# Altium PCB PMI_Action.PcbDoc
Units mm, origin at the board's own origin, x right, y up, seen from the top; angles counter-clockwise.
Board outline 87 x 58 mm, 2 copper layers (Top Layer, Bottom Layer); 69 components, 45 nets, 215 pads, 30 vias.
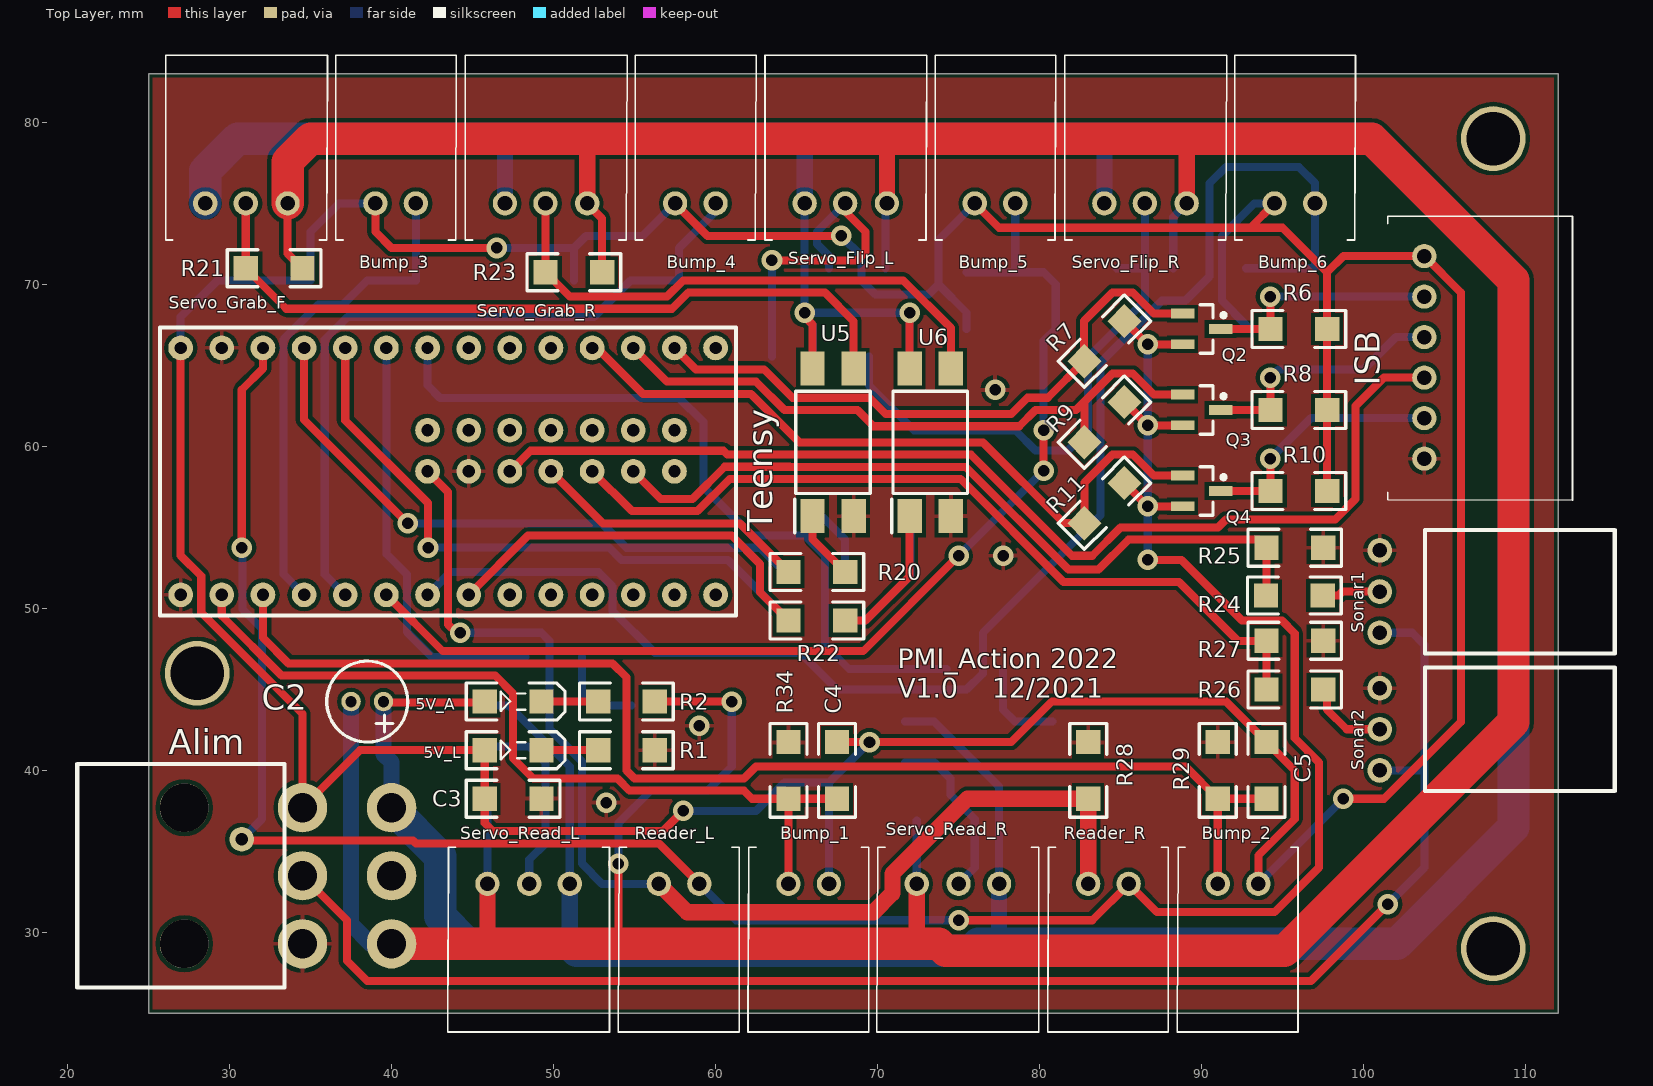
[diagram p0: Top Layer view]
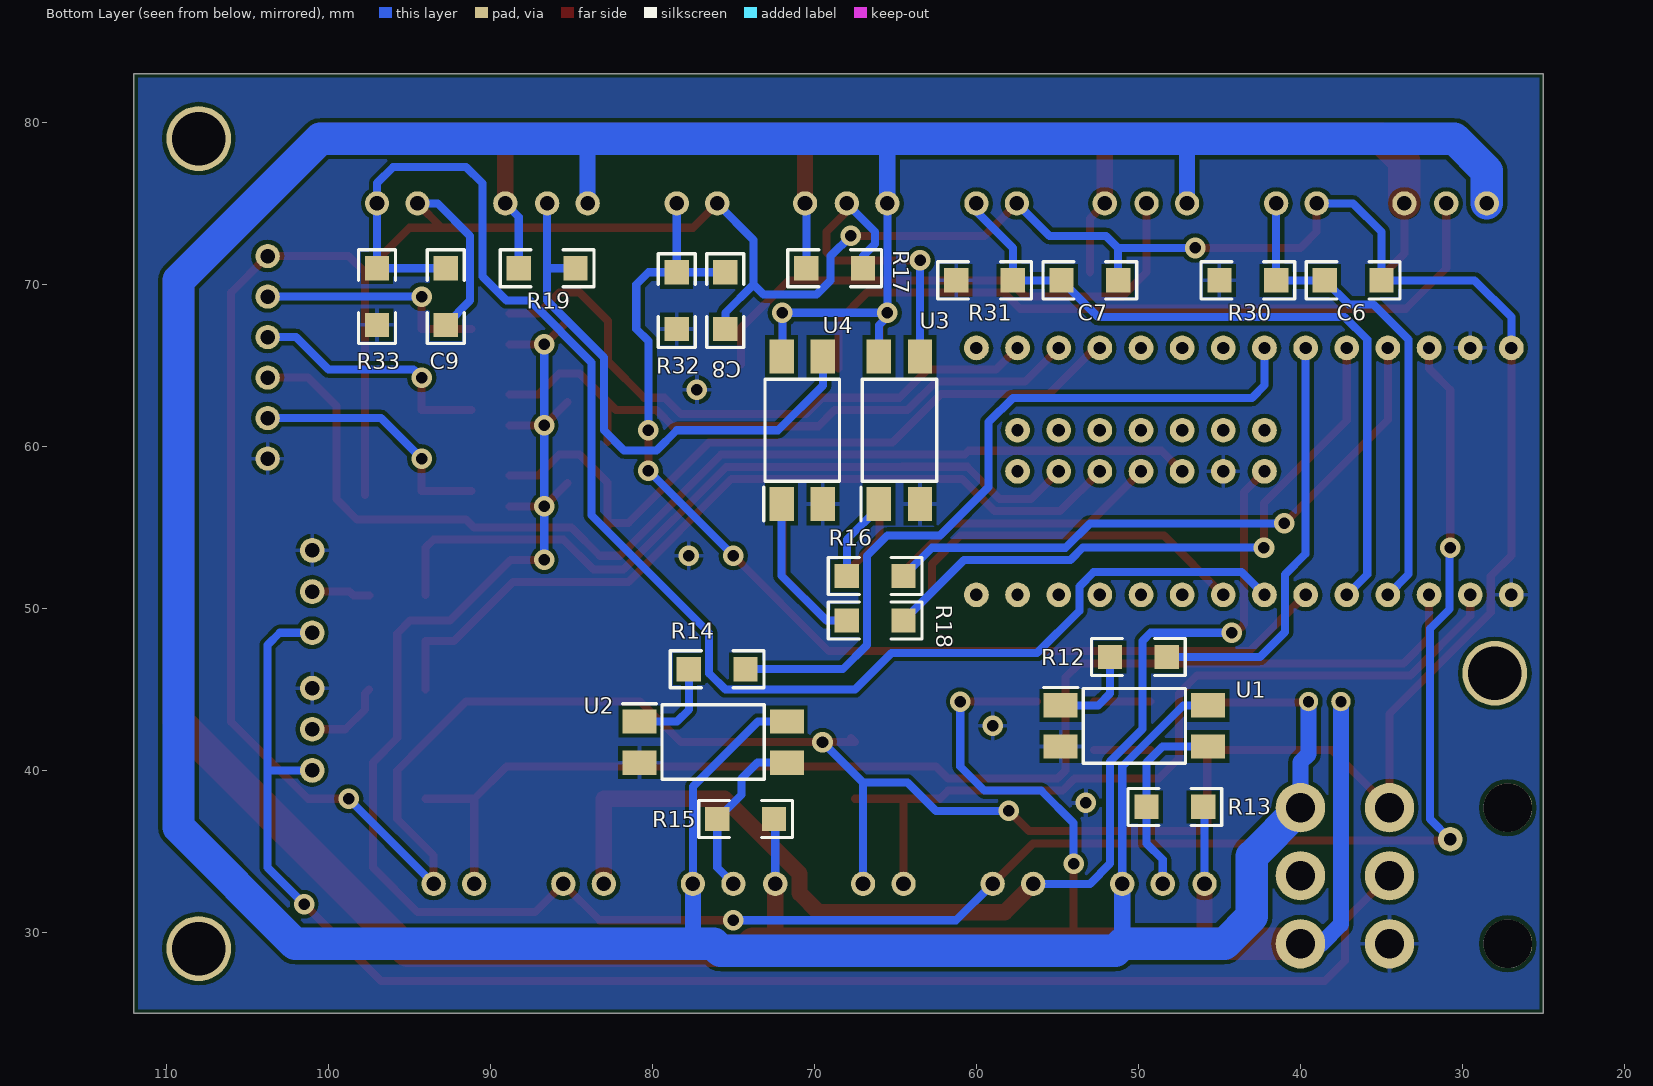
[diagram p1: Bottom Layer view, seen from below]
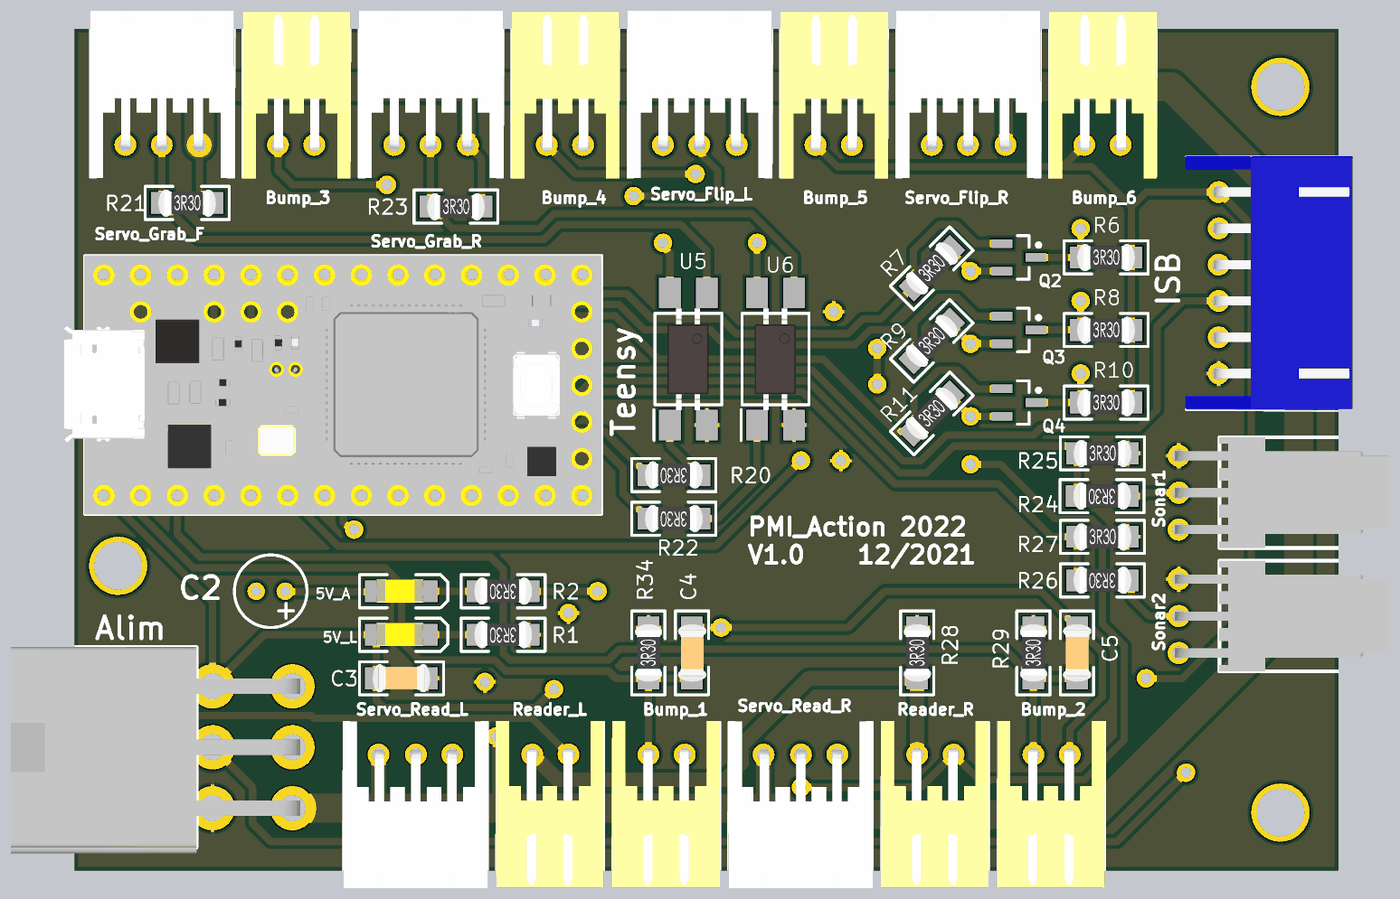
[diagram p2: 3D render of the assembled board from above, using the file's embedded part models]
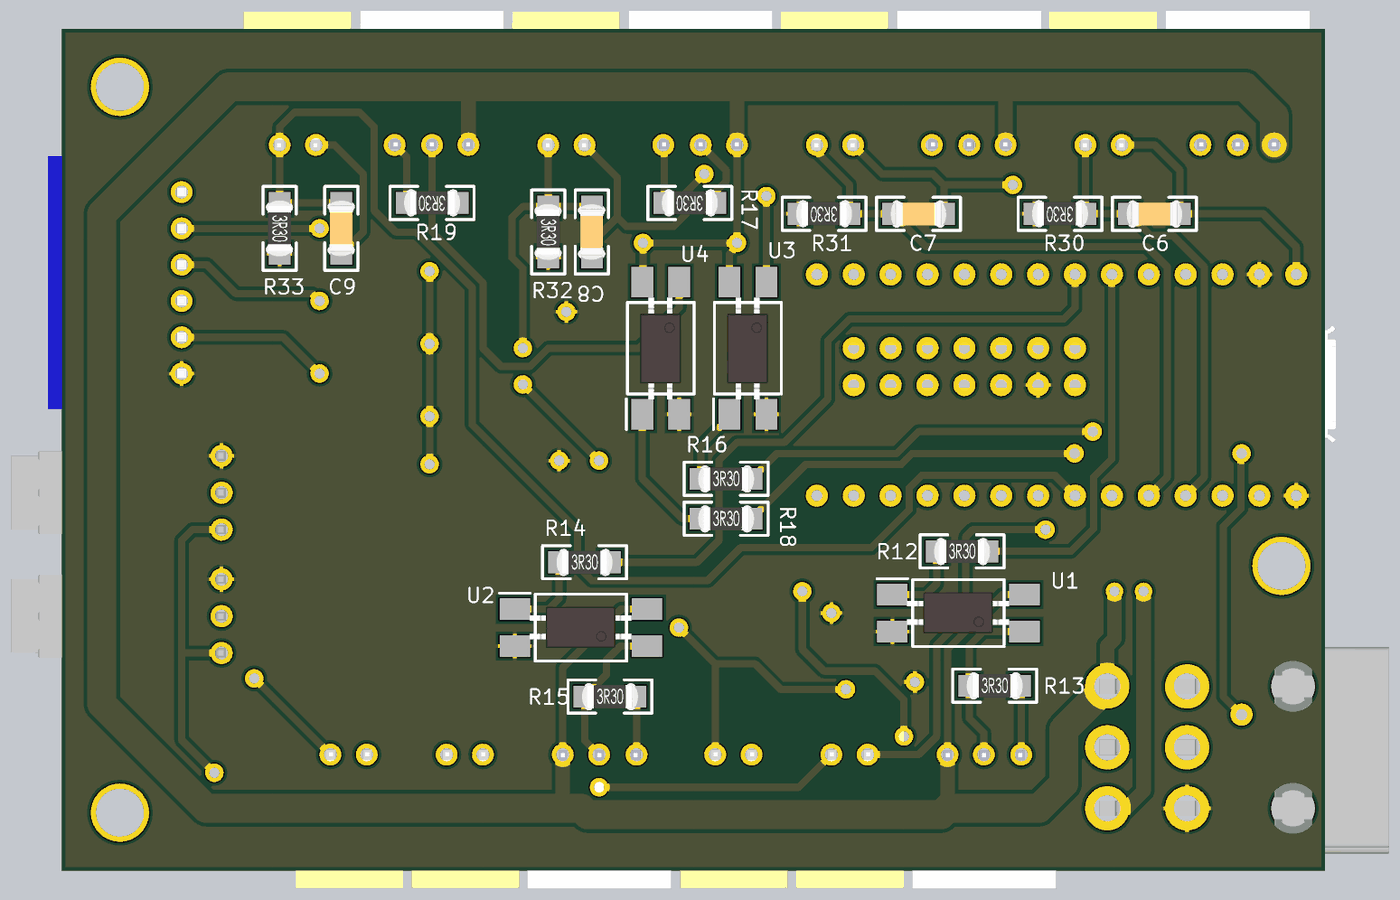
[diagram p3: 3D render of the assembled board from below, using the file's embedded part models]

## Layer stack, top to bottom
Top Solder: solder mask 0.0102, Solder Resist, Dk 3.5
Top Layer: signal copper 0.0356
Dielectric 1: dielectric 0.32, FR-4, Dk 4.8
Bottom Layer: signal copper 0.0356
Bottom Solder: solder mask 0.0102, Solder Resist, Dk 3.5

## Board outline
25,25 25,83 112,83 112,25

## Design rules (kind name [scope] priority, off if disabled: settings)
Clearance [All] p1: gap=0.254
HoleSize [All] p1: absolutevalues=TRUE maxlimit=4 minlimit=0.025 maxpercent=80.000 minpercent=20.000
MinimumSolderMaskSliver [All] p1: minsoldermaskwidth=0.2
PolygonConnect [All] p1: connectstyle=Relief reliefconductorwidth=0.254 reliefentries=4 polygonreliefangle="90 Angle" airgapwidth=0.254
RoutingVias [All] p1: holewidth=0.711 width=1.27 viastyle="Through Hole" minholewidth=0.711 minwidth=1.27 maxholewidth=0.711 maxwidth=1.27
SilkToSilkClearance [All] p1: silktosilkclearance=0.01
SilkToSolderMaskClearance [IsPad] p1: minsilkscreentomaskgap=0.05 clearancetoexposedcopper=TRUE
SolderMaskExpansion [All] p1: expansion=0.102
Width [All] p1: maxlimit=2 minlimit=0.254 preferedwidth=0.5 minimp=50.000000 maximp=50.000000 favimp=50.000000
26 further rules are at their usual default settings.

## Classes and differential pairs
component class PMI_Action_bumpers: Bump_1 Bump_2 Bump_3 Bump_4 Bump_5 Bump_6 C4 C5 C6 C7 C8 C9 R29 R30 R31 R32 R33 R34
component class PMI_Action: 5V_A 5V_L Alim C2 C3 ISB Q2 Q3 Q4 R1 R2 R6 R7 R8 R9 R10 R11 R12 R13 R14 R15 R16 R17 R18 R19 R20 R21 R22 R23 R24 R25 R26 R27 R34 Reader_L Reader_R S1 S2 S3 S4 Servo_Flip_L Servo_Flip_R Servo_Grab_F Servo_Grab_R Servo_Read_L Servo_Read_R Sonar1 Sonar2 Teensy U1 U2 U3 U4 U5 U6

## Components (designator, comment, footprint, x,y, rotation, side; value= is the part's Value field where it differs from the comment)
5V_A "5V_A" KP-3216SEC 47.5,44.25 r0 top (schematic designator LED2)
5V_L "5V_L" KP-3216SEC 47.5,41.25 r0 top (schematic designator LED1)
Alim "Header 3X2H" MOLEX_MINIFITJR_3X2 34.5,33.5 r270 top
Bump_1 "S2B-XH-A" S2B-XH-A 67,33 r180 top
Bump_2 "S2B-XH-A" S2B-XH-A 93.5,33 r180 top
Bump_3 "S2B-XH-A" S2B-XH-A 39,75 r0 top
Bump_4 "S2B-XH-A" S2B-XH-A 57.5,75 r0 top
Bump_5 "S2B-XH-A" S2B-XH-A 76,75 r0 top
Bump_6 "S2B-XH-A" S2B-XH-A 94.5,75 r0 top
C2 "Cap2" Capacitor 39.5,44.25 r180 top
C3 "(optional)" "Capacitor 1206" 47.5,38.25 r180 top
C4 "(optional)" "Capacitor 1206" 67.5,40 r90 top
C5 "(optional)" "Capacitor 1206" 94,40 r90 top
C6 "(optional)" "Capacitor 1206" 36.75,70.25 r180 bottom
C7 "(optional)" "Capacitor 1206" 53,70.25 r180 bottom
C8 "(optional)" "Capacitor 1206" 75.5,69 r270 bottom
C9 "(optional)" "Capacitor 1206" 92.75,69.25 r270 bottom
ISB "Header 6H" S6B-XH-A 103.75,71.75 r270 top
Q2 "MOSFET-N" SOT23_M 90,67.25 r0 top
Q3 "MOSFET-N" SOT23_M 90,62.25 r0 top
Q4 "MOSFET-N" SOT23_M 90,57.25 r0 top
R1 "Res2" "Resistor 1206" 54.5,41.25 r180 top
R2 "Res2" "Resistor 1206" 54.5,44.25 r180 top
R6 "Res2" "Resistor 1206" 96,67.25 r0 top
R7 "Res2" "Resistor 1206" 84,66.5 r45 top
R8 "Res2" "Resistor 1206" 96,62.25 r0 top
R9 "Res2" "Resistor 1206" 84,61.5 r45 top
R10 "Res2" "Resistor 1206" 96,57.25 r0 top
R11 "Res2" "Resistor 1206" 84,56.5 r45 top
R12 "Res2" "Resistor 1206" 50,47 r180 bottom
R13 "Res2" "Resistor 1206" 47.75,37.75 r180 bottom
R14 "Res2" "Resistor 1206" 76,46.25 r180 bottom
R15 "Res2" "Resistor 1206" 74.25,37 r180 bottom
R16 "Res2" "Resistor 1206" 66.25,52 r180 bottom
R17 "Res2" "Resistor 1206" 68.75,71 r0 bottom
R18 "Res2" "Resistor 1206" 66.25,49.25 r180 bottom
R19 "Res2" "Resistor 1206" 86.5,71 r0 bottom
R20 "Res2" "Resistor 1206" 66.25,52.25 r180 top
R21 "Res2" "Resistor 1206" 32.75,71 r0 top
R22 "Res2" "Resistor 1206" 66.25,49.25 r180 top
R23 "Res2" "Resistor 1206" 51.25,70.75 r0 top
R24 "Res2" "Resistor 1206" 95.725,50.8 r180 top
R25 "Res2" "Resistor 1206" 95.75,53.75 r0 top
R26 "Res2" "Resistor 1206" 95.75,45 r180 top
R27 "Res2" "Resistor 1206" 95.75,48 r0 top
R28 "Res2" "Resistor 1206" 83,40 r90 top
R29 "Res2" "Resistor 1206" 91,40 r90 top
R30 "Res2" "Resistor 1206" 43.25,70.25 r0 bottom
R31 "Res2" "Resistor 1206" 59.5,70.25 r0 bottom
R32 "Res2" "Resistor 1206" 78.5,69 r270 bottom
R33 "Res2" "Resistor 1206" 97,69.25 r270 bottom
R34 "Res2" "Resistor 1206" 64.5,40 r90 top
Reader_L "S2B-XH-A" S2B-XH-A 59,33 r180 top
Reader_R "S2B-XH-A" S2B-XH-A 85.5,33 r180 top
Servo_Flip_L "S3B-XH-A" S3B-XH-A 65.5,75 r0 top
Servo_Flip_R "S3B-XH-A" S3B-XH-A 84,75 r0 top
Servo_Grab_F "S3B-XH-A" S3B-XH-A 28.5,75 r0 top
Servo_Grab_R "S3B-XH-A" S3B-XH-A 47,75 r0 top
Servo_Read_L "S3B-XH-A" S3B-XH-A 51,33 r180 top
Servo_Read_R "S3B-XH-A" S3B-XH-A 77.5,33 r180 top
Sonar1 "KK254" "MOLEX KK254 3X1H M" 101,48.5 r90 top
Sonar2 "KK254" "MOLEX KK254 3X1H M" 101,40 r90 top
Teensy "Teensy 3.2" Teensy_A_PMI 28,54 r90 top
U1 "FOD817S" SOP254P1016X385-4N 50.25,42.75 r180 bottom
U2 "FOD817S" SOP254P1016X385-4N 76.25,41.75 r180 bottom
U3 "FOD817S" SOP254P1016X385-4N 64.75,61 r90 bottom
U4 "FOD817S" SOP254P1016X385-4N 70.75,61 r90 bottom
U5 "FOD817S" SOP254P1016X385-4N 67.25,60.25 r90 top
U6 "FOD817S" SOP254P1016X385-4N 73.25,60.25 r90 top

## Footprints (in the part's own frame and the unit in brackets; to place one, negate y for a bottom-side part, rotate by r counter-clockwise, add the part's x,y. Pads: shape width x height; smd on the part's side, far side on the other; paste and mask are expansions set on the pad)
Capacitor [mm] "10 - 4.7 uF 2mm"
  round 1.2 hole 0.7: 1(0,0) 2(2,0)
  silkscreen extent -1.5,-2.5 3.5,2.5
"Capacitor 1206" [mm]
  rect 1.5x1.5 smd: 1(-1.75,0) 2(1.75,0)
  silkscreen extent -2.89,-1.14 2.89,1.14, body extent -1.98,-0.99 1.98,0.96, height 1.3
KP-3216SEC [mm]
  rect 1.5x1.5 smd: 1(-1.75,0) 2(1.75,0)
  silkscreen extent -2.89,-1.14 3.2,1.14, body extent -1.7,-0.79 1.5,0.81, height 1.1
"MOLEX KK254 3X1H M" [mil]
  round 60 hole 35.43: 1(0,0) 2(100,0) 3(200,0)
  silkscreen extent -50,-571 250,-110, body extent -50,-570 250,11, height 230
MOLEX_MINIFITJR_3X2 [mm] "MOLEX_MINIFITJR_3X2, 39-30-1060"
  round 3.048 hole 1.8: 1(-4.2,5.5) 2(-4.2,0) 3(0,5.5) 4(0,0) 5(4.2,5.5) 6(4.2,0)
  round 3 hole 3 unplated: 10(-4.2,-7.3) 11(4.2,-7.3)
  silkscreen extent -6.9,-13.9 6.9,-1.1, body extent -6.9,-13.9 7.3,6.04, height 11.41
"Resistor 1206" [mm]
  rect 1.5x1.5 smd: 1(-1.75,0) 2(1.75,0)
  silkscreen extent -2.89,-1.14 2.89,1.14, body extent -1.98,-0.95 1.98,0.93, height 0.55
S2B-XH-A [mm]
  round 1.5 hole 0.9: 1(0,0) 2(2.5,0)
  silkscreen extent -2.45,-2.26 5,9.14, body extent -2.41,-2.32 4.99,9.18, height 6.15
S3B-XH-A [mm]
  round 1.5 hole 0.9: 1(0,0) 2(2.5,0) 3(5.08,0)
  silkscreen extent -2.45,-2.26 7.54,9.14, body extent -2.44,-2.27 7.46,9.23, height 6.15
S6B-XH-A [mm]
  round 1.5 hole 0.9: 1(0,0) 2(2.5,0) 3(5,0) 4(7.5,0) 5(10,0) 6(12.5,0)
  silkscreen extent -2.45,-2.26 15.08,9.14, body extent -2.45,-2.3 14.95,9.2, height 6.15
SOP254P1016X385-4N [mm]
  rect 2.1x1.5 smd: 1(-4.55,1.27) 2(-4.55,-1.27) 3(4.55,-1.27) 4(4.55,1.27)
  silkscreen extent -5.6,-2.3 3.15,2.37, body extent -3.53,-1.4 3.48,1.44, height 2.21
SOT23_M [mm] "SOT23, 3-Leads, Body 2.9x1.3mm, Pitch 0.95mm, Lead Span 2.3mm - Reverse Pinning, IPC Low Density"
  rect 1.45x0.6 smd: 1(1.175,0) 2(-1.175,-0.95) 3(-1.175,0.95)
  silkscreen extent -0.1,-1.5 1.48,1.5, body extent -0.7,-1.5 0.7,1.5, height 1.1
Teensy_A_PMI [mil] "Teensy 3.2"
  round 60 hole 30: 0(-124.41,-59.84) 1(-124.41,-159.84) 2(-124.41,-259.84) 3(-124.41,-359.84) 4(-124.41,-459.84) 5(-124.41,-559.84) 6(-124.41,-659.84) 7(-124.41,-759.84) 8(-124.41,-859.84) 9(-124.41,-959.84) 10(-124.41,-1059.84) 11(-124.41,-1159.84) 12(-124.41,-1259.84) 13(475.59,-1259.84) 14(475.59,-1159.84) 15(475.59,-1059.84) 16(475.59,-959.84) 17(475.59,-859.84) 18(475.59,-759.84) 19(475.59,-659.84) 20(475.59,-559.84) 21(475.59,-459.84) 22(475.59,-359.84) 23(475.59,-259.84) 24(175.59,-759.84) 25(175.59,-859.84) 26(175.59,-959.84) 27(175.59,-1059.84) 28(175.59,-1159.84) 29(275.59,-1159.84) 30(275.59,-1059.84) 31(275.59,-959.84) 32(275.59,-859.84) 33(275.59,-759.84) 36(175.59,-559.84) 37(275.59,-559.84) 39(275.59,-659.84) 40(175.59,-659.84) 41(475.59,-159.84) 42(475.59,-59.84) 43(475.59,40.16) 44(-124.41,40.16)
  silkscreen extent -174,-1310 526,90, body extent -176,-1310 527,147, height 505

## Part data
5V_A 5V_L: library part LED2, "Typical RED, GREEN, YELLOW, AMBER GaAs LED"
Alim: "Header, 3-Pin, Dual row, Right Angle"
Bump_1 Bump_2 Bump_3 Bump_4 Bump_5 Bump_6 Reader_L Reader_R: library part "Header 2H", "Header, 2-Pin, Right Angle"
C2: "Capacitor"
C3 C4 C5 C6 C7 C8 C9: library part Cap, "Capacitor"
ISB: "Header, 6-Pin, Right Angle"
Q2 Q3 Q4: "N-Channel MOSFET"
R1 R2 R6 R7 R8 R9 R10 R11 R12 R13 R14 R15 R16 R17 R18 R19 R20 R21 R22 R23 R24 R25 R26 R27 R28 R29 R30 R31 R32 R33 R34: "Resistor"
Servo_Flip_L Servo_Flip_R Servo_Grab_F Servo_Grab_R Servo_Read_L Servo_Read_R Sonar1 Sonar2: library part "Header 3H", "Header, 3-Pin, Right Angle"
Teensy: library part teensy3.2
U1 U2 U3 U4 U5 U6: library part Optoisolator1, "4-Pin Phototransistor Optocoupler"

## Free pads (board coordinates)
  round 1.524 hole 0.762: 3(30.75,35.75)
  round 4 hole 3.3: 5(28,46) 5(108,29) 5(108,79)

## Via types
v1: diameter 1.27, hole 0.711, Top Layer to Bottom Layer, 30 vias

## Nets (pads, with @x,y where several pads share a name; then routed paths per layer and width w, separated by ;. In a path a pad name is that pad's centre, name@x,y a point inside that pad or via, vN(x,y) a via of type N, cw(c..) or ccw(c..) an arc to the next point about the centre after c; other vN are vias at no path point)
3V_L: pad.3 Q2.2 Q3.2 Q4.2 R7.2 R9.2 R11.2 Reader_L.1 Reader_R.1 Teensy.41 | length 155.2
  Top Layer w0.5: pad.3 30.75,35.672 41.328,35.672 41.5,35.5 56.5,35.5 Reader_L.1 ; v1(30.75,53.75) 30.75,63.5 32.06,64.81 Teensy.41 ; v1(75,30.75) 83.25,30.75 Reader_R.1 87.25,31.25 94.5,31.25 97.25,34 97.25,40.5 95.75,42 95.75,48.463 94.959,49.254 92.496,49.254 88.75,53 v1(86.675,53) ; R11.2 v1(86.675,56.3) Q4.2 ; R9.2 v1(86.675,61.3) Q3.2 ; R7.2 v1(86.675,66.3) Q2.2
  Bottom Layer w0.5: pad.3 32,37 32,48.75 30.786,49.964 v1@30.786,53.714 ; Reader_L.1 61.25,30.75 v1(75,30.75) ; v1(86.675,53) v1(86.675,56.3) v1(86.675,66.3)
5V_A: 5V_A.1 Alim.1 C2.1 Servo_Flip_L.1 Servo_Flip_R.1 Servo_Grab_F.1 Servo_Grab_R.1 Servo_Read_L.1 Servo_Read_R.1 U1.4 U2.4 U3.4 U4.4 U5.4 U6.4 | length 284.8
  Top Layer w0.5: C2.1@40,44.2 5V_A.1@45.7,44.2 ; v1(65.5,68.25) 65.5,68 65.98,67.52 U5.4 ; U6.4@71.98,65.05 v1(71.98,68.25) v1@71.98,68.48
  Bottom Layer w0.5: 40,40.5 40.23,40.27 ; U1.4 47.23,44.02 51,40.25 Servo_Read_L.1 ; Servo_Flip_L.1 v1(65.5,68.25) ; U3.4 66.02,67.48 65.5,68 v1(65.5,68.25) ; U2.4 73.48,43.02 77.5,39 Servo_Read_R.1 ; U4.4@71.98,65.59 v1(71.98,68.25) v1(65.5,68.25)
  Bottom Layer w1: C2.1 39.5,41 40,40.5 Alim.1 ; Servo_Grab_R.1 47,79 ; 51,29.3 Servo_Read_L.1 ; Servo_Flip_L.1 65.5,79 ; 77.5,29.3 Servo_Read_R.1 ; Servo_Flip_R.1 84,79
  Bottom Layer w2: Servo_Grab_F.1 28.5,77 30.5,79 65.5,79 100.5,79 109.25,70.25 109.25,36.5 102.05,29.3 77.5,29.3 76.221,29.3 75.782,28.861 51.439,28.861 51,29.3 44.7,29.3 43,31 43,34.7 Alim.1
5V_L: 5V_L.1 Alim.2 Bump_1.1 Bump_2.1 Bump_3.1 Bump_4.1 Bump_5.1 Bump_6.1 C3.2 C4.2 C5.2 C6.2 C7.2 C8.2 C9.2 ISB.1 R6.2 R8.2 R10.2 Teensy.43 | length 294.3
  Top Layer w0.5: Teensy.43 26.98,53.27 28.254,51.996 28.254,49.746 34.5,43.5 Alim.2 38.05,41.25 5V_L.1 C3.2 45.75,36.75 46.246,36.254 56.754,36.254 v1(58,37.5) ; Bump_3.1 39,73.25 40,72.25 v1(46.5,72.25) ; Bump_4.1 59.5,73 v1(67.75,73) ; C4.2@67.75,42 C4.2 v1(69.5,41.75) 78.25,41.75 80.75,44.25 91.5,44.25 C5.2 95.75,40 95.75,37 93.5,34.75 Bump_2.1 ; Bump_5.1 77.5,73.5 93,73.5 ; Bump_6.1 93,73.5 ; R10.2@97.75,57 R8.2 R6.2 97.75,70.75 ; v1(98.75,38.25) 101.25,38.25 106,43 106,69.5 ISB.1 98.75,71.75 97.75,70.75 ; 93,73.5 95,73.5 97.75,70.75
  Bottom Layer w0.5: Teensy.43 26.98,67.98 29.25,70.25 C6.2 35,73.25 36.75,75 Bump_3.1 ; v1(46.5,72.25) 51.25,72.25 ; C7.2 51.25,72.25 ; Bump_4.1 55.5,73 52,73 51.25,72.25 ; v1(58,37.5) 62.5,37.5 64.25,39.25 67,39.25 ; Bump_1.1 67,39.25 ; v1(67.75,73) 69,71.75 69,70.25 69.861,69.389 73.139,69.389 73.75,70 ; v1(69.5,41.75) 67,39.25 ; C8.2 75.5,68.25 73.75,70 ; Bump_5.1 73.75,72.75 73.75,70 ; C9.2 91.25,69 91.25,73 93.25,75 Bump_6.1 ; Bump_2.1 v1(98.75,38.25)
12V_A: Alim.3
15V_S: Alim.4 Sonar1.1 Sonar2.1 | length 95.6
  Top Layer w0.5: Alim.4 37.25,30.75 37.25,28.25 38.5,27 96.75,27 v1(101.5,31.75)
  Bottom Layer w0.5: Sonar2.1 103.5,40 ; Sonar1.1 103,48.5 103.75,47.75 103.75,34 v1(101.5,31.75)
GND_A: Alim.5 C2.2 R2.1 R13.2 R15.2 R17.2 R19.2 R21.2 R23.2 Servo_Flip_L.3 Servo_Flip_R.3 Servo_Grab_F.3 Servo_Grab_R.3 Servo_Read_L.3 Servo_Read_R.3 | length 271.2
  Top Layer w0.5: Servo_Grab_F.3 33.58,71.92 R21.2 ; Servo_Grab_R.3 53,74.08 R23.2 ; 54,29.3 v1(54,34.25) ; R2.1 v1(61,44.25)
  Top Layer w1: 45.92,29.345 Servo_Read_L.3 ; Servo_Grab_R.3 52.08,78.92 ; Servo_Flip_L.3 70.58,78.83 ; 72.42,29.345 Servo_Read_R.3 ; Servo_Flip_R.3 89.08,78.92
  Top Layer w2: Servo_Grab_F.3 33.58,77.58 35,79 100.5,79 109.25,70.25 109.25,43 95.111,28.861 74.218,28.861 73.779,29.3 54,29.3 Alim.5
  Bottom Layer w0.5: Alim.5@38.7,29.3 Alim.5 ; Servo_Read_L.3 R13.2@45.92,37.67 ; v1(54,34.25) 54,36.75 56,38.75 59.5,38.75 61,40.25 v1(61,44.25) ; R17.2 Servo_Flip_L.3@70.5,74.92 ; Servo_Read_R.3 R15.2@72.42,36.92 ; R19.2 88.25,74.17 Servo_Flip_R.3
  Bottom Layer w1: C2.2 37.5,30.5 Alim.5@38.7,29.3
GND_L: Alim.6 C3.1 ISB.6 R1.1 R25.2 R27.2 R28.2 R29.2 R30.2 R31.2 R32.2 R33.2 R34.2 Sonar1.3 Sonar2.3 Teensy.40 Teensy.42 Teensy.44 U1.2 U2.2 U3.2 U4.2 U5.2 U6.2
  other v1: 53.25,38 59,42.75 77.75,53.25 77.25,63.5
ISB_CLOCK: ISB.5 Q4.1 R10.1 | length 15.9
  Top Layer w0.5: Q4.1 R10.1 v1(94.25,59.25) v1@94.25,59.5
  Bottom Layer w0.5: v1(94.25,59.25) 96.75,61.75 ISB.5
ISB_LOADING: ISB.3 Q3.1 R8.1 | length 15.9
  Top Layer w0.5: Q3.1 R8.1 v1(94.25,64.25) v1@94.25,64.5
  Bottom Layer w0.5: v1(94.25,64.25) 94.75,64.75 100,64.75 102,66.75 ISB.3
ISB_NEOPIXEL: ISB.2 Q2.1 R6.1 | length 14.8
  Top Layer w0.5: Q2.1 R6.1 v1(94.25,69.25) v1@94.25,69.5
  Bottom Layer w0.5: v1(94.25,69.25) ISB.2
NetLED1_2: 5V_L.2 R1.2 | length 3.5
  Top Layer w0.5: 5V_L.2 R1.2
NetLED2_2: 5V_A.2 R2.2 | length 3.5
  Top Layer w0.5: 5V_A.2 R2.2
NetR12_1: R12.1 U1.1 | length 5.6
  Bottom Layer w0.5: R12.1 51.75,44.75 52.48,44.02 U1.1
NetR13_1: R13.1 Servo_Read_L.2 U1.3 | length 12.1
  Bottom Layer w0.5: U1.3 48.52,41.48 49.5,40.5 R13.1 49.5,35.5 48.5,34.5 Servo_Read_L.2
NetR14_1: R14.1 U2.1 | length 5.9
  Bottom Layer w0.5: R14.1 77.75,43.75 78.48,43.02 U2.1
NetR15_1: R15.1 Servo_Read_R.2 U2.3 | length 10.7
  Bottom Layer w0.5: U2.3 73.52,40.48 74.5,39.5 74.5,38.5 R15.1 76,34 Servo_Read_R.2
NetR16_1: R16.1 U3.1 | length 5.3
  Bottom Layer w0.5: U3.1 66.02,56.23 68,54.25 R16.1
NetR17_1: R17.1 Servo_Flip_L.2 U3.3 | length 20.5
  Top Layer w0.5: v1(63.48,71.48) 68.73,71.48 69.25,72 69.25,73.25 68,74.5 Servo_Flip_L.2
  Bottom Layer w0.5: U3.3 v1(63.48,71.48) ; R17.1 67,71.754 66.254,72.5 66.254,73.254 Servo_Flip_L.2
NetR18_1: R18.1 U4.1 | length 9.6
  Bottom Layer w0.5: R18.1 69.25,49.25 72.02,52.02 U4.1
NetR19_1: R19.1 Servo_Flip_R.2 U4.3 | length 34.7
  Bottom Layer w0.5: U4.3 69.48,63.77 72.25,61 78.5,61 79.75,59.75 81.75,59.75 82.996,60.996 82.996,65.496 86.5,69 86.5,71 ; R19.1 86.5,71 ; Servo_Flip_R.2 86.5,71
NetR20_1: R20.1 U5.1 | length 4.3
  Top Layer w0.5: U5.1 65.98,54.27 R20.1
NetR21_1: R21.1 Servo_Grab_F.2 U5.3 | length 46.6
  Top Layer w0.5: Servo_Grab_F.2 R21.1 33.5,68.5 51.692,68.5 51.696,68.496 57.312,68.496 58.316,69.5 66.75,69.5 68.52,67.73 U5.3
NetR22_1: R22.1 U6.1 | length 8.8
  Top Layer w0.5: R22.1 69.25,49.25 71.98,51.98 U6.1
NetR23_1: R23.1 Servo_Grab_R.2 U6.3 | length 33.8
  Top Layer w0.5: Servo_Grab_R.2 R23.1 50.996,69.254 52.004,69.254 52.008,69.25 57,69.25 58.004,70.254 71.587,70.254 74.52,67.321 U6.3@74.52,65.05
SONAR_1: R24.1 Sonar1.2 | length 3.6
  Top Layer w0.5: R24.1 98.45,50.8 98.69,51.04 Sonar1.2
SONAR_2: R26.1 Sonar2.2 | length 5.1
  Top Layer w0.5: R26.1 97.75,44.75 97.75,43.75 98.96,42.54 Sonar2.2
T_BUMP_1: Bump_1.2 C4.1 R34.1 Teensy.0 | length 51.5
  Top Layer w0.5: Teensy.0 29.52,49.546 33.213,45.853 46.397,45.853 47.5,44.75 47.5,40.75 48.746,39.504 50.209,39.504 50.213,39.5 53.938,39.5 54.688,38.75 61.75,38.75 62.25,38.25 R34.1 ; Bump_1.2 R34.1 ; C4.1 R34.1
T_BUMP_2: Bump_2.2 C5.1 R29.1 Teensy.1 | length 77.9
  Top Layer w0.5: Teensy.1 32.06,48.194 33.647,46.607 53.643,46.607 54.5,45.75 54.5,40.004 55,39.504 61.754,39.504 62.5,40.25 89,40.25 R29.1 ; Bump_2.2 R29.1 ; C5.1 R29.1
T_BUMP_3: Bump_3.2 C6.1 R30.1 Teensy.2 | length 30.7
  Bottom Layer w0.5: Teensy.2 33.326,52.114 33.326,66.596 35.484,68.754 37.004,68.754 C6.1 R30.1 Bump_3.2
T_BUMP_4: Bump_4.2 C7.1 R31.1 Teensy.3 | length 45.4
  Bottom Layer w0.5: Teensy.3 35.874,52.106 35.874,66.604 37.27,68 52.5,68 C7.1 R31.1 57.75,72.25 60,74.5 Bump_4.2
T_BUMP_5: Bump_5.2 C8.1 R32.1 Teensy.4 | length 67.6
  Top Layer w0.5: Teensy.4 43.159,47.361 69.111,47.361 v1(75,53.25) ; v1@80.25,59 v1(80.25,61)
  Bottom Layer w0.5: v1@75.25,53.5 v1(80.25,58.5) ; C8.1 R32.1 ; Bump_5.2 R32.1 ; v1(80.25,61) 80.25,66.5 81,67.25 81,70 80.25,70.75 R32.1
T_BUMP_6: Bump_6.2 C9.1 R33.1 Teensy.5 | length 92.9
  Bottom Layer w0.5: Teensy.5 43.63,52.25 52.76,52.25 53.646,51.364 53.646,49.854 56.25,47.25 65.25,47.25 67.504,44.996 75.496,44.996 76.496,45.996 76.496,48.496 83.75,55.75 83.75,65.184 87.566,69 89,69 90.496,70.496 90.496,76.246 91.5,77.25 96,77.25 97,76.25 Bump_6.2 R33.1 C9.1
T_ISB_CLOCK: Q4.3 R11.1 Teensy.16 | length 44.7
  Top Layer w0.5: Teensy.16 52.67,66.08 55.508,63.242 62.192,63.242 65.184,60.25 76.5,60.25 81.487,55.263 R11.1@82.513,55.263 ; R11.1@82.763,55.013 R11.1 82.763,57.737 ; 82.763,57.763 84.5,59.5 85.75,59.5 87.05,58.2 Q4.3
T_ISB_LOADING: Q3.3 R9.1 Teensy.15 | length 40.3
  Top Layer w0.5: Teensy.15 57.004,63.996 62.504,63.996 64.25,62.25 68.75,62.25 69.754,61.246 78.746,61.246 79.75,62.25 82.25,62.25 82.75,62.75 ; R9.1 82.763,62.763 84.5,64.5 85.75,64.5 87.05,63.2 Q3.3
T_ISB_NEOPIXEL: Q2.3 R7.1 Teensy.14 | length 38.2
  Top Layer w0.5: Teensy.14 58.79,64.75 63,64.75 64.746,63.004 69.5,63.004 70.504,62 78.25,62 79.254,63.004 80.504,63.004 82.75,65.25 82.75,67.75 84.5,69.5 85.75,69.5 87.05,68.2 Q2.3
T_ISB_SERIAL: ISB.4 Teensy.24 | length 67.6
  Top Layer w0.5: Teensy.24 48.574,59.734 60.484,59.734 60.718,59.5 64.867,59.5 64.871,59.496 75.754,59.496 82,53.25 83.25,53.25 85,55 85.004,55.004 91.004,55.004 91.5,55.5 98.25,55.5 99.5,56.75 99.5,62.5 101.25,64.25 ISB.4
T_R_READING: R28.1 Reader_L.2 Reader_R.2 Teensy.36 | length 72.6
  Top Layer w0.5: Teensy.36 43.486,57.194 43.486,49.014 44,48.5 v1(44.25,48.5)
  Top Layer w1: Reader_L.2 58.25,31.25 69.75,31.25 70.916,32.416 70.916,33.623 75.543,38.25 R28.1 Reader_R.2
  Bottom Layer w0.5: v1(44.25,48.5) 49.25,48.5 49.75,48 49.75,42.566 51.754,40.562 51.754,34.246 53,33 Reader_L.2
T_SERVO_FLIP_L: R16.2 Teensy.23 | length 38.3
  Top Layer w0.5: Teensy.23 34.6,61.65 v1(41,55.25)
  Bottom Layer w0.5: v1(41,55.25) 53,55.25 54.504,53.746 62.75,53.746 64.496,52 R16.2
T_SERVO_FLIP_R: R18.2 Teensy.22 | length 38.6
  Top Layer w0.5: Teensy.22 37.14,61.61 42.25,56.5 v1(42.25,53.75)
  Bottom Layer w0.5: v1(42.25,53.75) 53.434,53.75 54.192,52.992 60.758,52.992 R18.2
T_SERVO_GRAB_F: R20.2 Teensy.25 | length 17.2
  Top Layer w0.5: Teensy.25 53.046,55.254 61.496,55.254 R20.2
T_SERVO_GRAB_R: R22.2 Teensy.6 | length 24.5
  Top Layer w0.5: Teensy.6 48.42,54.5 61,54.5 62.75,52.75 62.75,51 R22.2
T_SERVO_READ_L: R12.2 Teensy.21 | length 26
  Bottom Layer w0.5: Teensy.21 39.68,53.372 40.946,52.106 40.946,48.554 42.5,47 R12.2
T_SERVO_READ_R: R14.2 Teensy.20 | length 47.2
  Bottom Layer w0.5: Teensy.20 42.22,63.78 43,63 57.75,63 59.25,61.5 59.25,57.5 62.25,54.5 65.5,54.5 66.746,53.254 66.746,47.754 68.25,46.25 R14.2
T_SONAR_1: R24.2 R25.1 Teensy.27 | length 47.1
  Top Layer w0.5: Teensy.27 56.618,56.762 58.578,56.762 60.562,58.746 64.555,58.746 64.559,58.742 75.442,58.742 81.791,52.392 83.642,52.392 85.5,54.25 93.5,54.25 R25.1 R24.2@94,50.825
T_SONAR_2: R26.2 R27.1 Teensy.26 | length 50.6
  Top Layer w0.5: Teensy.26 54.832,56.008 58.891,56.008 60.875,57.992 64.243,57.992 64.247,57.988 75.129,57.988 81.479,51.638 88.612,51.638 92.25,48 R27.1 R26.2
pads on no net: Alim.10 Alim.11 Teensy.7 Teensy.8 Teensy.9 Teensy.10 Teensy.11 Teensy.12 Teensy.13 Teensy.17 Teensy.18 Teensy.19 Teensy.28 Teensy.29 Teensy.30 Teensy.31 Teensy.32 Teensy.33 Teensy.37 Teensy.39

## Polygon pours and split planes (outlines as drawn)
GND_L on Bottom Layer "Bottom Layer-GND" (solid, remove dead copper, pour order 6): 25.25,25.25 25.25,82.75 111.75,82.75 111.75,25.25
GND_L on Top Layer "Bottom Layer-GND" (solid, remove dead copper, pour order 8): 25.25,25.25 25.25,82.75 111.75,82.75 111.75,25.25

## Silkscreen, mask and mechanical layers (free items; w line width, h text height)
Top Overlay:
  text "PMI_Action 2022 / V1.0    12/2021" at 71.25,44.5 h1.2
Mechanical 1:
  the board outline again, w1.2